# Altium PCB SOM_PCB_6Layer.PcbDoc (part 4 of 6)
Units mil, origin at the board's own origin, x right, y up, seen from the top; angles counter-clockwise.
Board outline 1230 x 2725 mil, 6 copper layers (Top Layer, GND+SHIELD, MidLayer1, MidLayer2, PWR, Bottom Layer), stack 60.8 mil thick; 76 components, 194 nets, 972 pads, 577 vias.
Unrouted connection lines stored in the file: 151.
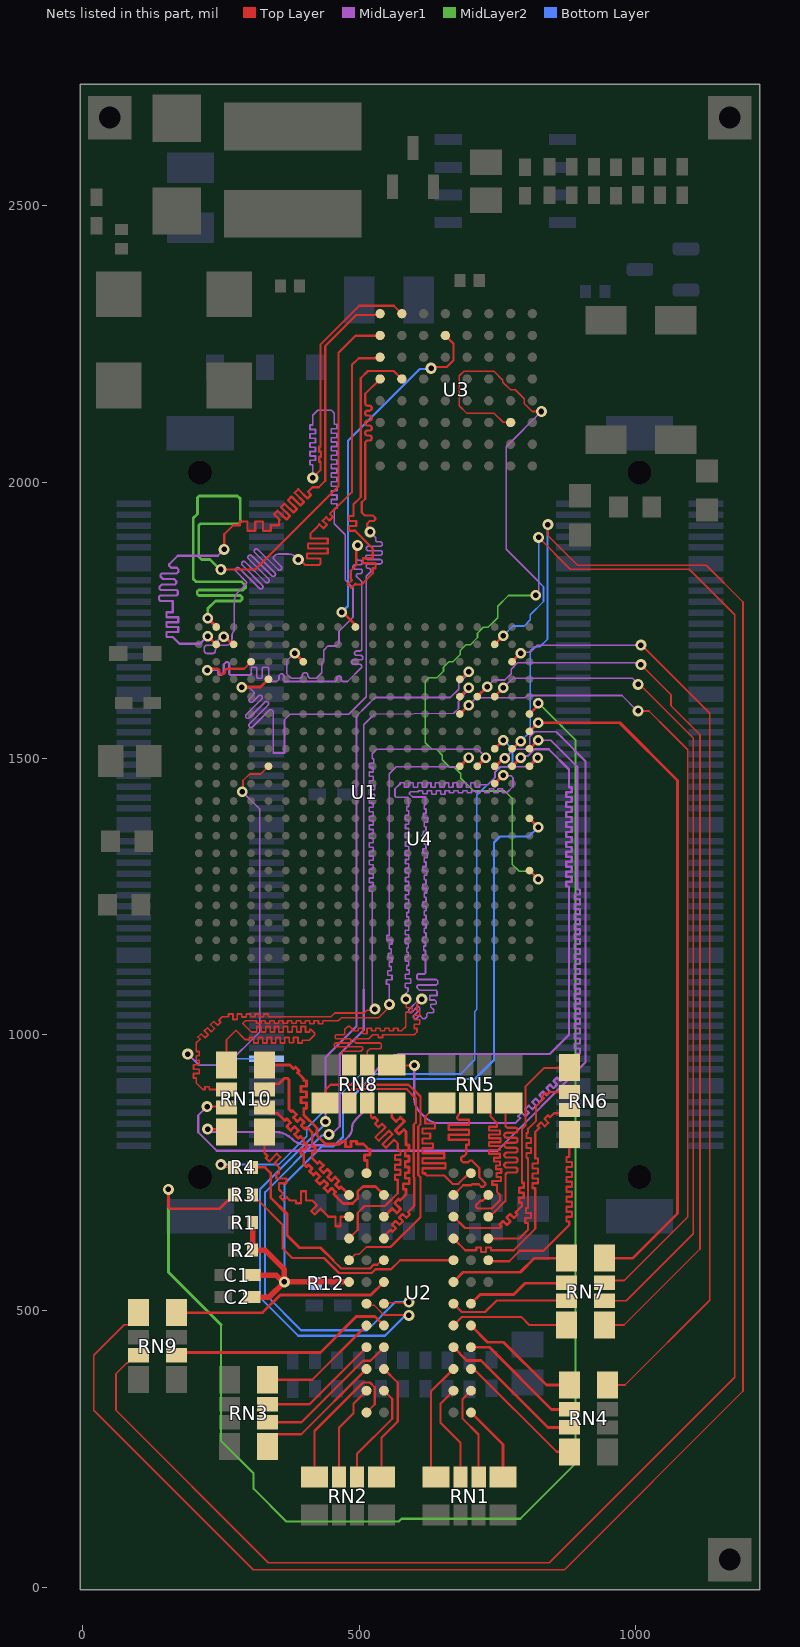
[diagram p7: the nets of this part, all layers, seen from the top]

## Via types
v1: diameter 19, hole 10, Top Layer to Bottom Layer, tented both sides, 352 vias
v2: diameter 20, hole 10, Top Layer to Bottom Layer, tented both sides, 223 vias
v3: diameter 20, hole 10, Top Layer to Bottom Layer, 1 vias
v4: diameter 30, hole 15, Top Layer to Bottom Layer, tented both sides, 1 vias

## Nets (pads, with @x,y where several pads share a name; then routed paths per layer and width w, separated by ;. In a path a pad name is that pad's centre, name@x,y a point inside that pad or via, vN(x,y) a via of type N, cw(c..) or ccw(c..) an arc to the next point about the centre after c; other vN are vias at no path point) (continued)
DDR_D9: RN8.3 U1.J20 | length 1581.9
  Top Layer w3: RN8.3@482.35,945 482.35,951 469.24,964.11 469.24,968.24 471,970 503.24,970 507,973.76 507,976.24 505.24,978 457,978 455,980 455,982.5 457.5,985 483.61,985 485.37,986.76 485.37,990.7 483.61,992.46 458.46,992.46 456.7,994.22 456.7,998.16 458.46,999.92 472.42,999.92 474.19,1001.69 474.19,1009.69 479.5,1015 483.29,1015 487.57,1010.72 487.57,1007 497,1007 498.5,1007 498.5,1009.24 498.5,1011.69 506.5,1011.69 506.5,1002 514.5,1002 514.5,1011.69 522.5,1011.69 522.5,1007 530.5,1007 530.5,1011.69 538.5,1011.69 538.5,1007 546.5,1007 546.5,1011.76 554.5,1011.76 554.5,1007 562.5,1007 562.5,1012 570.5,1012 570.5,1007 577,1007 ; 577.36,1007.36 577,1007 ; v2(585,1064.5) 585.5,1064 585.5,1056.5 585.5,1049 596.03,1049 596.03,1041 585.5,1041 584.59,1040.09 584.59,1014.59 577,1007
  Top Layer w5: U1.J20@808.46,1485.98 808.57,1485.98 823.59,1501 v1(823.7,1501)
  MidLayer1 w3: v2(585,1064.5) 585,1075 588.74,1078.74 588.74,1083.68 588.74,1085.18 583.74,1085.18 583.74,1093.18 593.74,1093.18 593.74,1101.18 583.74,1101.18 583.74,1109.18 590.76,1109.18 590.76,1117.18 586.24,1117.18 586.24,1125.18 589.74,1125.18 589.74,1133.18 583.74,1133.18 583.74,1141.18 589.22,1141.18 589.22,1149.18 586.24,1149.18 586.24,1157.18 589.22,1157.18 589.22,1165.18 583.74,1165.18 583.74,1173.18 589.74,1173.18 589.74,1181.18 583.75,1181.18 583.75,1189.18 589.74,1189.18 589.74,1197.18 583.74,1197.18 583.74,1205.18 589.74,1205.18 589.74,1213.18 586.24,1213.18 586.24,1221.18 589.74,1221.18 589.74,1229.18 583.74,1229.18 583.74,1237.18 589.74,1237.18 589.74,1245.18 584,1245.18 584,1253.18 589.74,1253.18 589.74,1261.18 583.74,1261.18 583.74,1269.18 589.74,1269.18 589.74,1277.18 584,1277.18 584,1285.18 589.74,1285.18 589.74,1293.18 583.74,1293.18 583.74,1301.18 589.74,1301.18 589.74,1309.18 584,1309.18 584,1317.18 589.74,1317.18 589.74,1325.18 583.74,1325.18 583.74,1333.18 589.74,1333.18 589.74,1341.18 584,1341.18 584,1349.18 589.74,1349.18 589.74,1357.18 583.74,1357.18 583.74,1365.18 589.74,1365.18 589.74,1373.18 584,1373.18 584,1381.18 589.74,1381.18 589.74,1389.18 583.74,1389.18 583.74,1397.18 589.74,1397.18 589.74,1405.18 586.24,1405.18 586.24,1413.18 589.88,1413.18 589.88,1421.18 588.74,1421.18 588.74,1425.59 588.74,1430 566.76,1430 565,1431.76 565,1445 572.61,1452.61 574.11,1452.61 574.11,1456.24 582.11,1456.24 582.11,1447.61 590.11,1447.61 590.11,1456.24 598.11,1456.24 598.11,1447.61 606.11,1447.61 606.11,1456.24 614.11,1456.24 614.11,1447.61 622.11,1447.61 622.11,1456.24 630.11,1456.24 630.11,1447.61 638.11,1447.61 638.11,1456.24 646.11,1456.24 646.11,1447.61 654.11,1447.61 654.11,1456.24 662.11,1456.24 662.11,1447.61 670.11,1447.61 670.11,1456.24 678.11,1456.24 678.11,1447.61 686.11,1447.61 686.11,1456 694.11,1456 694.11,1447.61 702.11,1447.61 702.11,1456 710.11,1456 710.11,1447.61 718.11,1447.61 718.11,1452.61 726.11,1452.61 733.54,1452.61 746.22,1465.28 746.22,1476.21 755,1484.99 805,1485 821.11,1501.11 821.21,1501 v1(823.7,1501)
DDR_D10: RN8.2 U1.K18 | length 1580.8
  Top Layer w3: RN8.2@515,945 515,970 519.7,974.7 538.24,974.7 540,976.45 540,983.24 538.24,985 494.13,985 492.37,986.76 492.37,990.74 494.13,992.5 517.5,992.5 525,1000 534.5,1000 534.5,995 542.5,995 542.5,1000 551.08,1000 600,1000 605,1005 605,1009.74 605,1011.24 600,1011.24 600,1019.24 610,1019.24 610,1027.24 600,1027.24 600,1035.24 610,1035.24 610,1043.24 605,1043.24 605,1045 605,1054.98 613.5,1063.48 v2(613.5,1064.5)
  Top Layer w5: U1.K18@745.47,1454.49 745.59,1454.49 761.1,1470 v1(761.22,1470)
  MidLayer1 w3: v2(613.5,1064.5) 609.5,1064.5 590,1045 590,1041.76 591.76,1040 595,1040 606.38,1051.38 607.12,1051.38 610,1048.5 610,1045 598.13,1033.13 598.13,1031.87 601.26,1028.74 603.74,1028.74 610,1035 615.01,1029.99 616.26,1028.74 618.74,1028.74 622.5,1032.5 622.5,1037.5 625,1040 633.24,1040 635,1041.76 635,1045 630,1050 630,1055 638.24,1055 640,1056.76 640,1060 637.06,1062.94 628,1062.94 628,1070.94 641.23,1070.94 641.23,1078.94 639.73,1080.44 609.56,1080.44 605,1085 605,1088.24 606.76,1090 640,1090 642.23,1092.23 642.23,1097.77 640,1100 606.76,1100 605,1101.76 605,1108.24 606.76,1110 618.47,1110 620.23,1111.76 620.23,1135 620.23,1136.5 615.23,1136.5 615.23,1144.5 620.23,1144.5 620.23,1152.5 617.22,1152.5 617.22,1160.5 620.23,1160.5 620.23,1168.5 615.23,1168.5 615.23,1176.5 621.24,1176.5 621.24,1184.5 617.74,1184.5 617.74,1192.5 621.24,1192.5 621.24,1200.5 615.23,1200.5 615.23,1208.5 621.24,1208.5 621.24,1216.5 617.74,1216.5 617.74,1224.5 621.67,1224.5 621.67,1232.5 615.23,1232.5 615.23,1240.5 621.24,1240.5 621.24,1248.5 617.74,1248.5 617.74,1256.5 622.17,1256.5 622.17,1264.5 615.23,1264.5 615.23,1272.5 621.24,1272.5 621.24,1280.5 617.74,1280.5 617.74,1288.5 622.68,1288.5 622.68,1296.5 615.23,1296.5 615.23,1304.5 621.24,1304.5 621.24,1312.5 617.74,1312.5 617.74,1320.5 623.18,1320.5 623.18,1328.5 615.79,1328.5 615.79,1336.5 621.24,1336.5 621.24,1344.5 617.74,1344.5 617.74,1352.5 623.69,1352.5 623.69,1360.5 616.29,1360.5 616.29,1368.5 621.24,1368.5 621.24,1376.5 617.74,1376.5 617.74,1384.5 624.19,1384.5 624.19,1392.5 616.8,1392.5 616.8,1400.5 621.24,1400.5 621.24,1408.5 617.74,1408.5 617.74,1416.5 620.23,1416.5 620.23,1420.5 620.23,1430.23 597,1430.23 591.47,1435.76 591.47,1438.24 593.23,1440 606.11,1440 607.61,1440 607.61,1441.61 615.61,1441.61 615.61,1436.23 623.61,1436.23 623.61,1441.61 631.61,1441.61 631.61,1435 639.61,1435 639.61,1441.61 647.61,1441.61 647.61,1435 655.61,1435 655.61,1441.61 663.61,1441.61 663.61,1438 671.61,1438 671.61,1441.61 679.61,1441.61 679.61,1438 687.61,1438 687.61,1441.61 695.61,1441.61 695.61,1438 703.61,1438 703.61,1441.61 711.61,1441.61 711.61,1438 719.61,1438 719.61,1441.8 727.61,1441.8 727.61,1438 735.61,1438 735.61,1445 743.61,1445 743.61,1438 751.61,1438 751.61,1445 759.61,1445 759.61,1438 767.61,1438 778.72,1449.11 778.72,1465 775.22,1468.5 762.72,1468.5 v1(761.22,1470)
DDR_D11: RN8.1 U1.H20 | length 1581.3
  Top Layer w4: RN8.1@559.15,945 559.65,944.5 v2(600,944.5)
  Top Layer w5: U1.H20@808.46,1517.48 v1(824.21,1533.23)
  MidLayer1 w3: v1(824.21,1533.23) 846.77,1533.23 866.75,1513.25
  MidLayer1 w4: v2(600,944.5) 600,884.14 ccw(c634.14,884.14) 609.98,860.02 620,850 ccw(c644.14,874.14) 644.14,840 782.73,840 787.24,844.52 791.76,849.03 788.23,852.57 794.59,858.93 801.11,852.42 807.47,858.78 800.95,865.3 807.32,871.66 813.83,865.15 820.2,871.51 813.68,878.03 820.05,884.39 826.56,877.87 832.93,884.24 826.41,890.75 832.77,897.12 839.29,890.6 845.65,896.97 839.14,903.48 845.5,909.85 852.02,903.33 858.38,909.69 851.87,916.21 858.23,922.57 864.74,916.06 871.11,922.42 864.59,928.94 870.96,935.3 877.47,928.79 883.84,935.15 877.32,941.67 883.69,948.03 887.22,944.49 895,952.27 895,955.1 895,966 900,966 900,975 890,975 890,984 900,984 900,993 890,993 890,1002 900,1002 900,1011 890,1011 890,1020 900,1020 900,1029 890,1029 890,1038 900,1038 900,1047 890,1047 890,1056 900,1056 900,1065 890,1065 890,1074 900,1074 900,1083 890,1083 890,1092 900,1092 900,1101 890,1101 890,1110 900,1110 900,1119 890,1119 890,1128 900,1128 900,1137 890,1137 890,1146 900,1146 900,1155 890,1155 890,1164 900,1164 900,1173 890,1173 890,1182 900,1182 900,1191 890,1191 890,1200 900,1200 900,1209 890,1209 890,1218 900,1218 900,1227 890,1227 890,1236 900,1236 900,1245 890,1245 890,1254 900,1254 900,1263 895,1263 895,1265 895,1485 866.75,1513.25
DDR_D12: RN10.4 U1.J19 | length 1625.5
  Top Layer w4: v2(226,829) 255,829 RN10.4@260,824
  Top Layer w5: U1.J19@776.97,1485.98 777.33,1485.98 792.35,1501 v1(792.72,1501)
  MidLayer1 w4: v2(226,829) 231,824 348.99,824 cw(c348.99,783.03) 377.96,812 ccw(c406.93,840.97) 406.93,800 453.47,800 ccw(c453.47,827.84) 473.15,808.15 481.31,816.31 ccw(c466.74,830.87) 487.34,830.87 cw(c507.94,830.87) 493.36,845.43 513.97,866.03 ccw(c492.75,887.25) 522.75,887.25 522.75,910.43 cw(c564.57,910.43) 534.98,939.98 547.5,952.5 cw(c577.68,922.32) 577.68,965 845,965 880,1000 880,1266 880,1268 875,1268 875,1277 885,1277 885,1286 875,1286 875,1295 885,1295 885,1304 875,1304 875,1313 885,1313 885,1322 875,1322 875,1331 885,1331 885,1340 875,1340 875,1349 885,1349 885,1358 875,1358 875,1367 885,1367 885,1376 875,1376 875,1385 885,1385 885,1394 875,1394 875,1403 885,1403 885,1412 875,1412 875,1421 885,1421 885,1430 875,1430 875,1439 884.85,1439 884.85,1448 880,1448 880,1460 880,1480 843.27,1516.73 818,1516.73 805.5,1504.24 795.4,1504.24 792.72,1501.56 v1(792.72,1501)
DDR_D13: RN10.3 U1.J18 | length 1636.4
  Top Layer w4: v2(225,870) 258.2,870 RN10.3@260,868.2
  Top Layer w5: U1.J18@745.47,1485.98 747.44,1485.98 761.75,1500.3 v1(763.72,1500.3)
  MidLayer1 w3: v1(763.72,1500.3) 779.99,1516.56 801.56,1516.56 809.21,1524.21 809.21,1539.44 818,1548.23 856.77,1548.23 866.75,1538.25
  MidLayer1 w4: v2(225,870) 209,854 209,823.37 242.37,790 750,790 910,950 910,1495 866.75,1538.25
DDR_D14: RN10.2 U1.J17 | length 1597.3
  Top Layer w3: RN10.2@260,900.85 238.61,900.85 229.11,900.85 229.11,905.85 221.11,905.85 221.11,900.85 217.23,900.85 205.5,912.58 205.5,920.19 205.5,921.69 200.5,921.69 200.5,929.69 210.5,929.69 210.5,937.69 200.5,937.69 200.5,945.69 210.5,945.69 210.5,953.69 205.5,953.69 205.5,961.69 210.5,961.69 210.5,969.69 205.5,969.69 205.5,975 205.5,985.5 211.12,991.12 212.18,992.18 208.65,995.72 214.3,1001.37 221.37,994.3 227.03,999.96 219.96,1007.03 225.62,1012.69 232.69,1005.62 238.34,1011.27 231.27,1018.34 236.93,1024 244,1016.93 249.66,1022.59 246.12,1026.12 252.5,1032.5 262.28,1032.5 263.78,1032.5 263.78,1037.5 271.78,1037.5 271.78,1027.5 279.78,1027.5 279.78,1037.5 287.78,1037.5 287.78,1032 295.78,1032 295.78,1037.5 303.78,1037.5 303.78,1032.5 311.78,1032.5 311.78,1037.5 319.78,1037.5 319.78,1032.5 327.78,1032.5 327.78,1037.5 335.78,1037.5 335.78,1032.5 350.91,1032.5 449.32,1032.5 456.16,1039.34 509.34,1039.34 514.31,1044.31 526.94,1044.31 v2(528.81,1046.19)
  Top Layer w5: U1.J17@713.98,1485.98 v1(729.72,1501.73)
  MidLayer1 w3: v2(528.81,1046.19) 528.81,1050.79 523.63,1055.97 523.63,1258 523.63,1259.5 518.63,1259.5 518.63,1267.5 526,1267.5 526,1275.5 518.63,1275.5 518.63,1283.5 526,1283.5 526,1291.5 518.63,1291.5 518.63,1299.5 526,1299.5 526,1307.5 518.63,1307.5 518.63,1315.5 526,1315.5 526,1323.5 518.63,1323.5 518.63,1331.5 526,1331.5 526,1339.5 518.63,1339.5 518.63,1347.5 526,1347.5 526,1355.5 518.63,1355.5 518.63,1363.5 526,1363.5 526,1371.5 518.63,1371.5 518.63,1379.5 526,1379.5 526,1387.5 518.63,1387.5 518.63,1395.5 526,1395.5 526,1403.5 518.63,1403.5 518.63,1411.5 526,1411.5 526,1419.5 518.63,1419.5 518.63,1427.5 528.63,1427.5 528.63,1435.5 518.63,1435.5 518.63,1443.5 528.63,1443.5 528.63,1451.5 518.63,1451.5 518.63,1459.5 526,1459.5 526,1467.5 518.63,1467.5 518.63,1475.5 526,1475.5 526,1483.5 518.63,1483.5 518.63,1491.5 526.75,1491.5 526.75,1499.5 523.63,1499.5 523.63,1508.63 531.73,1516.73 714.72,1516.73 v1(729.72,1501.73)
DDR_D15: RN10.1 U1.J16 | length 1637.8
  Top Layer w3: RN10.1@260,945 260,990.62 277.19,1007.81 291.46,993.54 291.46,993.22 293.22,991.46 298.54,991.46 300,990 301.5,990 301.5,995 309.5,995 309.5,985 317.5,985 317.5,995 325.5,995 325.5,985 333.5,985 333.5,995 341.5,995 341.5,985 349.5,985 349.5,995 357.5,995 357.5,985 365.5,985 365.5,995 373.5,995 373.5,985.5 381.5,985.5 381.5,995 389.5,995 389.5,985 397.5,985 397.5,990 405.88,990 410,990 420,1000 420,1002.49 412.49,1010 410.98,1010 410.98,1005 402.98,1005 402.98,1015 394.98,1015 394.98,1005 386.98,1005 386.98,1015 378.98,1015 378.98,1005 370.98,1005 370.98,1015 362.98,1015 362.98,1005 354.98,1005 354.98,1015 346.98,1015 346.98,1005 338.98,1005 338.98,1015 330.98,1015 330.98,1005 322.98,1005 322.98,1015 314.98,1015 314.98,1005 306.98,1005 305,1005 289.69,1020.31 294.38,1025 305,1025 306.5,1025 306.5,1025.5 314.5,1025.5 314.5,1021 322.5,1021 322.5,1025.5 330.5,1025.5 330.5,1021 338.5,1021 338.5,1025.5 346.5,1025.5 346.5,1021 354.5,1021 354.5,1025.5 362.5,1025.5 362.5,1021 370.5,1021 370.5,1025.5 378.5,1025.5 378.5,1021 386.5,1021 386.5,1025.5 394.5,1025.5 394.5,1021 402.5,1021 402.5,1025.5 410.5,1025.5 410.5,1020 418.5,1020 418.5,1025.5 426.5,1025.5 426.5,1020 434.5,1020 434.5,1025.5 442.5,1025.5 442.5,1025 445.66,1025 462.63,1025 468.32,1030.69 535.23,1030.69 555,1050.45 v2(555,1055)
  Top Layer w5: U1.J16@682.48,1485.98 v1(698.23,1501.73)
  MidLayer1 w3: v2(555,1055) 554.75,1055.25 554.75,1090 554.75,1091.5 549.75,1091.5 549.75,1099.5 559.75,1099.5 559.75,1107.5 552.27,1107.5 552.27,1115.5 558.24,1115.5 558.24,1123.5 554.75,1123.5 554.75,1131.5 559.75,1131.5 559.75,1139.5 552.77,1139.5 552.77,1147.5 558.24,1147.5 558.24,1155.5 554.75,1155.5 554.75,1163.5 559.75,1163.5 559.75,1171.5 550.04,1171.5 550.04,1179.5 554.75,1179.5 554.75,1205 554.75,1472.54 567.21,1485 681.5,1485 v1(698.23,1501.73)
DDR_D\C\A\S\: RN7.3 U1.F16 | length 1512.6
  Top Layer w3: RN7.3@944.5,551.3 948.2,555 980,555 1095,670 1095,1515.92 1061.42,1549.5 1024.92,1586 v2(1005,1586)
  Top Layer w5: U1.F16@682.48,1580.47 v1(698.23,1596.22)
  MidLayer1 w3: v1(698.23,1596.22) 712.01,1610 800.51,1610 804.51,1614 975.83,1614 1003.83,1586 v2(1005,1586)
DDR_D\C\L\K\E\: RN9.3 U1.B18 | length 3533
  Top Layer w3: RN9.3@101,420.05 95,420.05 80.8,405.85 79.72,405.85 60,386.13 60,320 335.5,44.5 844.5,44.5 1180,380 1180,1760 1097.5,1842.5 882.5,1842.5 v2(825,1900)
  Top Layer w5: U1.B18@745.47,1706.46 v1(761.22,1722.2)
  Bottom Layer w3: v1(761.22,1722.2) 778.72,1739.7 798.8,1739.7 810,1750.9 810,1760 834,1784 834,1810.8 825.5,1819.3 825.5,1899.5 v2(825,1900)
DDR_D\C\S\0\: RN4.4 U1.C19 | length 1737.4
  Top Layer w3: RN4.4@950,366 981.47,366 1135,519.53 1135,1581.92 1011.92,1705 v2(1010,1705)
  Top Layer w5: U1.C19@776.97,1674.96 v1(792.72,1690.71)
  MidLayer1 w3: v1(792.72,1690.71) 794.43,1692.42 809.72,1692.42 822.3,1705 v2(1010,1705) v2@1015,1705
DDR_D\R\A\S\: RN7.1 U1.E17 | length 1659.2
  Top Layer w3: RN7.1@944.5,474.5 979.5,474.5 1117,612 1117,1543 1064.5,1595.5 1064.5,1615.5 v2(1010,1670)
  Top Layer w5: U1.E17@713.98,1611.97 v1(731.68,1629.68)
  MidLayer1 w3: v1(731.68,1629.68) 744.1,1642.1 763.9,1642.1 775.22,1653.41 775.22,1661.48 786.94,1673.2 1006.8,1673.2 v2(1010,1670)
DDR_D\W\R\: RN7.2 U1.E18 | length 1526.2
  Top Layer w3: RN7.2@944.5,518.65 983.65,518.65 1105,640 1105,1536.92 1060.09,1581.83 1007.92,1634 v2(1005,1634)
  Top Layer w5: U1.E18@745.47,1611.97 v1(761.22,1627.72)
  MidLayer1 w3: v1(761.22,1627.72) 778.5,1645 995,1645 1005,1635 v2(1005,1634)
DDR_DCLK0_N: U1.E16 U2.G3 | length 1715.8
  Top Layer w3: U2.G3@545,513.15 546.49,514.64 v2@587.75,514.64
  Top Layer w4: U1.E16@682.48,1611.97 v1(698.23,1627.72)
  MidLayer1 w3: 508.5,1081.24 508.5,1560.76 527.68,1579.94 671.54,1581.96 680,1590.42 680,1603.48 689.23,1612.71 689.23,1615.85 698.23,1624.84 v1(698.23,1627.72)
  MidLayer1 w4: v2(445.51,819.49) 448.57,822.56 453.45,822.56 465,834.1 465,964.9 508.5,1008.4 508.5,1081.24
  Bottom Layer w4: v2(445.51,819.49) 443.78,817.76 432.76,817.76 330,715 330,530 395,465 514.6,465 565.73,516.13 v2(590.26,516.13)
DDR_DCLK0_P: U1.D16 U2.G2 | length 1789.9
  Top Layer w3: U2.G2@513.5,513.15 516.01,510.64 527,510.64 544.99,492.65 588.73,492.65 589.24,492.13 v2(590.26,492.13)
  Top Layer w4: U1.D16@682.48,1643.46 683.73,1643.46 696.98,1656.71 v1(698.23,1656.71)
  MidLayer1 w3: 495.5,1081.24 495.5,1576.97 513.07,1594.55 528.75,1610.22 665.22,1610.22 680.19,1625.19 680.19,1635.5 698.23,1653.53 v1(698.23,1656.71)
  MidLayer1 w4: v2(439.31,842.68) 439.31,959.31 495.5,1015.5 495.5,1081.24
  Bottom Layer w4: v2(439.31,842.68) 439.31,839.06 321,720.75 321,524.1 390.1,455 547,455 585.54,493.54 588.86,493.54 v2(590.26,492.13)
DDR_DQM0: RN7.4 U1.G20 | length 1267.1
  Top Layer w5: U1.G20@808.46,1548.98 v1(824.21,1564.72) 971.94,1564.72 1076.5,1460.17 1076.5,676.5 995.5,595.5 RN7.4@944.5,595.5
DDR_DQM1: RN9.1 U1.H19 | length 3935.1
  Top Layer w3: RN9.1@101,496.85 101,491.35 84.5,474.85 74.85,474.85 20,420 20,320 308.28,31.72 871.72,31.72 1195,355 1195,1783.08 1128.58,1849.5 895.5,1849.5 841.97,1903.03 v2(841.97,1923.23)
  Top Layer w5: U1.H19@776.97,1517.48 777.99,1517.48 792.07,1531.56 v1(793.09,1531.56)
  Bottom Layer w3: v1(793.09,1531.56) 810,1548.47 810,1695 817.2,1702.2 827.2,1702.2 841,1716 841,1922.26 v2(841.97,1923.23)
DDR_DQS0: R3.1 U1.F20 | length 2848
  Top Layer w5: v2(155,720) 155,687.93 157.93,685 247.48,685 R3.1@272.48,710 ; U1.F20@808.46,1580.47 824.21,1596.22 v1(824.21,1600)
  MidLayer2 w3: v1(824.21,1600) 825.04,1600 866.75,1558.29
  MidLayer2 w4: 250,475 250,265 309.19,205.81 309.19,178.19 368.37,119 571.84,119 576.84,124 791.63,124 892,224.37 892,1533.04 866.75,1558.29
  MidLayer2 w5: v2(155,720) 155,570 250,475
DDR_DQS1: R4.1 U1.H18 | length 1212.6
  Top Layer w3: v2@250,760 R4.1@272.48,760
  Top Layer w5: U1.H18@745.47,1517.48 v1(761.22,1533.23)
  Bottom Layer w3: v2(250,765) 354.64,765 405.6,815.96 405.6,830.89 503.71,929 684,929 709.5,954.5 709.5,1041.92 713.22,1045.64 713.22,1433.7 746.05,1466.52 746.05,1474.62 756.57,1485.15 768.38,1485.15 777.72,1494.5 777.72,1516.72 761.77,1532.68 761.77,1533.23 v1(761.22,1533.23)
DDR_RES_A0: RN1.8 U2.K7 | length 216.5
  Top Layer w4: RN1.8@639.5,199.5 630,209 630,354.06 U2.K7@670.98,395.04
DDR_RES_A1: RN1.6 U2.L8 | length 174.3
  Top Layer w4: U2.L8@702.48,355.67 687.48,340.67 687.48,305.15 716.35,276.28 RN1.6@716.35,199.5
DDR_RES_A2: RN1.7 U2.L7 | length 180.9
  Top Layer w4: U2.L7@670.98,355.67 647.5,332.18 647.5,297.5 683.7,261.3 RN1.7@683.7,199.5
DDR_RES_A3: RN1.5 U2.M8 | length 144.3
  Top Layer w5: U2.M8@699.99,313.81 U2.M8@702.48,316.3 760.5,258.28 RN1.5@760.5,199.5
DDR_RES_A4: RN2.8 U2.M2 | length 284.2
  Top Layer w4: RN2.8@419.5,199.5 419.5,282.88 507.29,370.67 519.72,370.67 528.5,361.88 528.5,331.3 U2.M2@513.5,316.3
DDR_RES_A5: RN2.6 U2.L3 | length 188.7
  Top Layer w4: RN2.6@496.35,199.5 496.35,241.35 560,305 560,340.67 U2.L3@545,355.67
DDR_RES_A6: RN2.7 U2.L2 | length 176.8
  Top Layer w4: RN2.7@463.7,199.5 463.7,288.7 490,315 490,332.17 U2.L2@513.5,355.67
DDR_RES_A7: RN2.5 U2.K3 | length 218.1
  Top Layer w4: RN2.5@540.5,199.5 540.5,270.5 570,300 570,370.04 U2.K3@545,395.04
DDR_RES_A8: RN3.5 U2.K2 | length 240.4
  Top Layer w4: RN3.5@334.5,254.5 334.5,260 351.5,277 395.46,277 U2.K2@513.5,395.04
DDR_RES_A9: RN3.6 U2.J3 | length 266.7
  Top Layer w4: RN3.6@334.5,298.65 395.9,298.65 507.29,410.04 520.63,410.04 U2.J3@545,434.41
DDR_RES_A10: RN4.8 U2.K8 | length 240.7
  Top Layer w4: U2.K8@702.48,395.04 707.59,395.04 857.63,245 RN4.8@881,245
DDR_RES_A11: RN3.7 U2.J2 | length 221.7
  Top Layer w4: RN3.7@334.5,331.3 410.39,331.3 U2.J2@513.5,434.41
DDR_RES_A12: RN3.8 U2.H2 | length 219.7
  Top Layer w4: RN3.8@334.5,375.5 415.22,375.5 U2.H2@513.5,473.78
DDR_RES_BA0: RN4.6 U2.J8 | length 225.1
  Top Layer w5: U2.J8@702.48,434.41 735.59,434.41 848.15,321.85 RN4.6@881,321.85
DDR_RES_BA1: RN4.7 U2.J7 | length 270.2
  Top Layer w5: U2.J7@670.98,434.41 694.85,410.54 720.77,410.54 842.11,289.2 RN4.7@881,289.2
DDR_RES_D0: RN5.5 U2.A8 | length 514.8
  Top Layer w4: RN5.5@650,876 644.5,876 620,851.5 620,849.19 620,839.34 637.72,839.34 637.72,830.34 615,830.34 615,821.34 629,821.34 629,812.34 615,812.34 615,803.34 634.03,803.34 634.03,794.34 615,794.34 615,785.34 654.1,785.34 654.1,776.34 615,776.34 615,767.34 656.58,767.34 656.58,758.34 615,758.34 615,749.34 620,749.34 620,747.34 622.34,745 654.14,745 669.14,730 679.67,730 699.04,749.37 U2.A8@702.48,749.37
DDR_RES_D1: RN5.7 U2.B9 | length 503.7
  Top Layer w4: RN5.7@726.8,876 737.8,865 737.8,852.2 749.49,840.51 749.49,838.83 749.49,833.47 735.25,833.47 735.25,826.47 754.99,826.47 754.99,819.47 735.25,819.47 735.25,812.47 755.81,812.47 755.81,805.47 735.25,805.47 735.25,798.47 754.99,798.47 754.99,791.47 735.25,791.47 735.25,784.47 754.99,784.47 754.99,777.47 744.01,777.47 744.01,770.47 754.99,770.47 754.99,763.47 748.09,763.47 748.09,756.47 757.29,756.47 757.29,749.47 748.98,749.47 748.98,742.47 757.14,742.47 757.14,735.47 741.29,735.47 741.29,728.47 749.49,728.47 749.49,726.47 749.49,715.51 755,710 755,700.38 740.25,685.63 714.37,685.63 711.66,688.34 711.66,691.66 719.49,699.49 723.27,699.49 733.79,710 U2.B9@733.98,710
DDR_RES_D2: RN5.6 U2.B7 | length 423.8
  Top Layer w4: U2.B7@670.98,710 688.7,727.72 702.75,727.72 704.48,729.45 716.57,729.45 721.03,725 725,725 728.34,728.34 728.34,731.66 717.48,742.52 717.48,758.91 704.06,772.33 700.74,772.33 697.64,769.23 688.12,769.23 685,772.34 685,777.66 687.34,780 690,780 694.15,784.15 694.15,801 699.15,801 699.15,810 662.3,810 662.3,819 699.15,819 699.15,828 662.3,828 662.3,837 699.15,837 699.15,846 679.99,846 677.64,848.35 677.64,851.66 680.5,854.51 680.5,856.35 687.21,863.06 RN5.6@694.15,863.06
DDR_RES_D3: RN5.8 U2.C9 | length 419.4
  Top Layer w4: U2.C9@733.98,670.63 736.56,670.63 745.47,679.53 763.96,698.03 765.14,699.21 765.14,735.08 765.14,746.08 cw(c769.64,746.08) 769.64,750.58 782.5,750.58 ccw(c782.5,755.08) 782.5,759.58 767.49,759.58 cw(c767.49,764.08) 767.49,768.58 782.5,768.58 ccw(c782.5,773.08) 782.5,777.58 767.49,777.58 cw(c767.49,782.08) 767.49,786.58 782.5,786.58 ccw(c782.5,791.08) 782.5,795.58 767.49,795.58 cw(c767.49,800.08) 767.49,804.58 782.5,804.58 ccw(c782.5,809.08) 782.5,813.58 767.49,813.58 cw(c767.49,818.08) 767.49,822.58 782.5,822.58 ccw(c782.5,827.08) 782.5,831.58 769.64,831.58 cw(c769.64,836.08) 765.14,836.08 765.14,854.92 765.14,870.14 RN5.8@771,876
DDR_RES_D4: RN6.5 U2.C7 | length 534.1
  Top Layer w4: U2.C7@670.98,670.63 691.61,650 755,650 756.45,651.45 757.86,652.86 754.33,656.4 760.69,662.76 767.76,655.69 774.13,662.05 767.05,669.13 773.42,675.49 780.49,668.42 786.85,674.78 783.32,678.32 790,685 795,690 795,694 795,696 790,696 790,705 798,705 798,714 790,714 790,723 798,723 798,732 795,732 795,741 795,830 801.5,836.5 801.5,906.5 835,940 878.25,940 RN6.5@880.5,937.75
DDR_RES_D5: RN6.6 U2.D9 | length 454.5
  Top Layer w4: U2.D9@733.98,631.26 789.95,631.26 806,647.31 806,657.24 806,659.24 801,659.24 801,668.24 811,668.24 811,677.24 802.06,677.24 802.06,686.24 806,686.24 806,695 806,775 806,777 803,777 803,786 811,786 811,795 803,795 803,804 811,804 811,813 803,813 803,822 806,822 806,829.69 820.5,844.19 820.5,870.5 833.43,883.43 834.84,884.84 831.3,888.38 837.67,894.74 841.2,891.2 845.8,895.8 846.35,896.35 RN6.6@880.5,896.35
DDR_RES_D6: RN6.7 U2.D7 | length 542.1
  Top Layer w4: U2.D7@670.98,631.26 692.24,610 710,610 712,610 712,615 721,615 721,606.89 730,606.89 730,615 739,615 739,610 745,610 780,610 819,649 819,720 819,722 814,722 814,731 824,731 824,740 814,740 814,749 824,749 824,758 814,758 814,767 824,767 824,776 819,776 819,785 819,824 825,830 826.41,831.41 822.88,834.95 829.24,841.31 836.31,834.24 842.68,840.61 835.61,847.68 841.97,854.04 845.51,850.51 853,858 874.8,858 RN6.7@880.5,863.7
DDR_RES_D7: RN6.8 U2.E9 | length 468.4
  Top Layer w4: U2.E9@733.98,591.89 735.87,590 772.02,590 791.01,608.99 833.99,608.99 880.5,655.5 880.5,659.7 880.5,661.7 875.5,661.7 875.5,670.7 885.5,670.7 885.5,679.7 875.5,679.7 875.5,688.7 885.5,688.7 885.5,697.7 875.5,697.7 875.5,706.7 885.5,706.7 885.5,715.7 875.5,715.7 875.5,724.7 885.5,724.7 885.5,733.7 875.5,733.7 875.5,742.7 885.5,742.7 885.5,751.7 875.5,751.7 875.5,760.7 885.5,760.7 885.5,769.7 875.5,769.7 875.5,778.7 880.5,778.7 880.5,785 RN6.8@880.5,819.5
DDR_RES_D8: RN8.5 U2.E1 | length 592.4
  Top Layer w3: U2.E1@482.01,591.89 492.88,602.76 499.85,602.76 512.85,615.76 557.08,615.76
  Top Layer w4: RN8.5@438.15,876 440,877.85 440,901 448.5,909.5 589.66,909.5 611.15,888.01 611.15,837.81 607,833.66 607,746.03 611.15,741.88 611.15,669.83 557.08,615.76
DDR_RES_D9: RN8.6 U2.D3 | length 483.7
  Top Layer w4: RN8.6@482.3,876 483.3,877 483.3,899.57 485.23,901.5 586.34,901.5 603.15,884.69 603.15,841.12 599,836.97 599,742.72 600,741.72 600,689.85 590.07,679.92 588.66,678.51 592.2,674.98 585.83,668.61 578.76,675.68 572.4,669.32 579.47,662.25 573.1,655.88 566.03,662.95 559.67,656.59 566.74,649.52 560.38,643.16 556.84,646.69 549.44,639.29 545,634.85 U2.D3@545,631.26 U2.D3@548.76,631.26
DDR_RES_D10: RN8.7 U2.D1 | length 503.4
  Top Layer w4: U2.D1@482.01,631.26 497.51,646.76 497.51,677.51 510,690 546.92,690 ; RN8.7@514.95,876 521.83,869.12 521.83,851.5 523.8,849.53 525.22,848.12 528.1,851 534.46,844.64 528.73,838.9 535.09,832.54 541.48,838.93 547.84,832.56 529.57,814.29 535.93,807.92 554.21,826.2 560.57,819.83 542.3,801.56 548.66,795.19 563.4,809.93 570,803.33 570,793.5 570,791.5 575,791.5 575,782.5 565,782.5 565,773.5 575,773.5 575,764.5 565,764.5 565,755.5 575,755.5 575,746.5 565,746.5 565,737.5 570,737.5 570,730 570,720 570,713.08 548.69,691.77 547.98,691.77
DDR_RES_D11: RN8.8 U2.C3 | length 374.4
  Top Layer w5: U2.C3@545,670.63 551.25,676.88 560.09,685.72 568.43,677.37 575.5,684.44 564.44,695.5 571.51,702.57 574.23,699.86 579.68,705.31 585,710.63 585,717.86 585,720.36 580,720.36 580,730.36 590.83,730.36 590.83,740.36 583.5,740.36 583.5,750.36 590.5,750.36 590.5,760.36 583.5,760.36 583.5,770.36 590.5,770.36 590.5,780.36 583.5,780.36 583.5,790.36 590.5,790.36 590.5,800.36 585,800.36 585,810 585,825 583.16,826.84 581.4,828.6 572.61,819.82 565.54,826.89 582.08,843.43 575.01,850.5 567.25,842.75 560.92,849.08 559.15,850.85 RN8.8@559.15,876
DDR_RES_D12: RN10.5 U2.C1 | length 462.8
  Top Layer w4: RN10.5@329,824 329,786 334.49,780.51 330.96,776.97 337.32,770.61 351.22,784.51 357.59,778.14 347.22,767.78 355,760 355,749 350,749 350,740 368.49,740 368.49,731 355,731 355,720 362.78,712.22 356.73,706.17 363.09,699.81 369.14,705.86 375,700 377.31,700 379.62,700 386,700 386,695 395,695 395,716.66 404,716.66 404,700 415,700 415.97,699.03 423.75,691.25 413.46,680.96 419.83,674.6 430.11,684.89 435,680 443.28,671.72 444.37,670.63 446.55,670.63 457.55,670.63 457.55,653.24 466.55,653.24 466.55,670.63 U2.C1@482.01,670.63
DDR_RES_D13: RN10.6 U2.B3 | length 463.7
  Top Layer w5: RN10.6@329,868.15 339.5,857.65 352.35,857.65 363.83,846.17 365.6,844.4 369.14,847.93 376.21,840.86 369.14,833.79 376.21,826.72 383.28,833.79 390.35,826.72 383.28,819.65 390.35,812.58 393.89,816.11 398.23,811.77 400,810 400,805.98 400,803.48 405,803.48 405,793.48 395,793.48 395,783.48 400,783.48 400,775 400,765.73 402.86,762.86 404.63,761.1 408.17,764.63 415.24,757.56 410.51,752.83 417.58,745.76 422.31,750.49 429.38,743.42 422.31,736.35 429.38,729.28 436.45,736.35 443.52,729.28 436.45,722.21 443.52,715.13 450.59,722.21 457.66,715.13 454.13,711.6 458.6,707.13 460.36,705.36 471.23,694.5 488.43,694.5 497.51,703.58 497.51,715.92 507.08,725.5 529.5,725.5 U2.B3@545,710
DDR_RES_D14: RN10.7 U2.B1 | length 405.9
  Top Layer w5: RN10.7@329,900.8 339.5,911.3 355.44,911.3 365.36,921.22 370.36,921.22 373.29,918.29 373.29,886.71 373.29,865.06 375.82,862.52 377.59,860.76 379.55,862.72 386.62,855.65 381.12,850.15 388.19,843.08 393.69,848.58 400.76,841.51 395.26,836.01 402.34,828.94 405.87,832.47 407.4,830.94 409.17,829.17 415.11,823.24 415.11,799.74 415.11,797.24 420.11,797.24 420.11,787.24 415.11,787.24 415.11,776.9 423.15,768.86 424.92,767.09 428.46,770.62 435.53,763.55 428.75,756.78 435.82,749.71 442.6,756.48 449.67,749.41 442.89,742.63 449.96,735.56 456.74,742.34 463.81,735.27 457.03,728.49 464.11,721.42 467.35,724.66 471.74,720.27 473.5,718.5 U2.B1@482.01,710
DDR_RES_D15: RN10.8 U2.A2 | length 449.2
  Top Layer w5: RN10.8@329,945 375,945 379.87,940.13 381.63,938.37 384.79,941.52 391.86,934.45 388.7,931.3 398.23,921.77 400,920 400,919.14 400,916.64 405,916.64 405,906.64 395,906.64 395,896.64 405,896.64 405,886.64 395,886.64 395,876.64 405,876.64 405,866.64 400,866.64 400,855 424.11,830.89 424.11,817.56 439.64,802.03 447.33,802.03 463,802.03 465.5,802.03 465.5,807.03 475.5,807.03 475.5,797.03 485.5,797.03 485.5,807.03 495.5,807.03 495.5,802.03 507.97,802.03 515,795 515,792.5 520,792.5 520,782.5 510,782.5 510,772.5 515,772.5 515,767.72 515,750.87 U2.A2@513.5,749.37
DDR_RES_D\C\A\S\: RN7.6 U2.G8 | length 188.8
  Top Layer w5: U2.G8@702.48,513.15 719.33,530 780,530 800,550 874.15,550 RN7.6@875.5,551.35
DDR_RES_D\C\L\K\E\: RN9.6 U2.H3 | length 410.7
  Top Layer w5: RN9.6@170,420 175,425 430,425 495,490 528.78,490 U2.H3@545,473.78
DDR_RES_D\C\S\0\: RN4.5 U2.H8 | length 223.2
  Top Layer w5: U2.H8@702.48,473.78 732.85,443.41 761.73,443.41 839.14,366 RN4.5@881,366
DDR_RES_D\R\A\S\: RN7.8 U2.H7 | length 217.1
  Top Layer w4: U2.H7@670.98,473.78 686.48,489.28 793.5,489.28 808.28,474.5 RN7.8@875.5,474.5
DDR_RES_D\W\R\: RN7.7 U2.G7 | length 219.2
  Top Layer w4: U2.G7@670.98,513.15 685.98,498.15 728.15,498.15 748.7,518.7 RN7.7@875.5,518.7
DDR_RES_DQM0: RN7.5 U2.F7 | length 222.3
  Top Layer w5: U2.F7@670.98,552.52 688.46,570 791.75,570 817.25,595.5 RN7.5@875.5,595.5
DDR_RES_DQM1: RN9.8 U2.F3 | length 398.1
  Top Layer w5: RN9.8@170,496.85 325.59,496.85 357.39,528.65 521.13,528.65 U2.F3@545,552.52
DDR_RES_DQS0: R3.2 U2.E7 | length 457.4
  Top Layer w4: R3.2@307.52,710 307.52,708.23 315.56,700.19 317.33,700.19 361.54,655.98 361.54,613.5 379.04,596 436.63,596 463.74,568.89 523.03,568.89 529.66,575.52 558,575.52 574.37,591.89 U2.E7@670.98,591.89
DDR_RES_DQS1: R4.2 U2.E3 | length 368.4
  Top Layer w4: 452.64,592.01 467.76,576.89 519.72,576.89 526.35,583.52 532.84,583.52 541.21,591.89 U2.E3@545,591.89
  Top Layer w5: R4.2@307.52,760 330,760 340,750 340,705 370.04,674.96 370.04,636.63 392.35,614.32 430.33,614.32 452.64,592.01
DDR_VREF: C1.1 C2.2 R1.1 R2.2 R12.2 U1.M20 U2.F1 | length 1646.6
  Top Layer w5: U1.M20@808.46,1391.5 v1(824.21,1375.75)
  Top Layer w10: C2.2@305.76,525 337.48,525 v2(365,552.52) ; C1.1@305.76,565 349.81,565 362.29,552.52 v2(365,552.52) ; R2.2@307.52,608.23 R2.2@307.52,610 ; R1.1@307.52,660 R2.2@307.52,610 ; U2.F1@482.01,552.52 v2(365,552.52) ; R2.2@307.52,610 330,610 365,575 v2(365,552.52)
  Bottom Layer w4: R12.2@422.48,550 419.96,552.52 v2(365,552.52) 365,730 432.5,797.5 453.5,797.5 471,815 471,871 520,920 710,920 744.22,954.22 744.22,1149.26 744.22,1243.75 744.22,1347.76 755.21,1358.75 807.22,1358.75 v1(824.21,1375.75)
DR0PRI: U1.J5 U4.94 | length 844.8
  Top Layer w3: v1(288.9,1439.67) 288.9,1439.81 290,1440.92 290,1460 301.94,1471.94 321.98,1471.94 U1.J5@336.02,1485.98
  MidLayer1 w3: v2(190,965) 210.5,944.5 259.75,944.5 320,1004.75 320,1081.24 320,1408.56 v1(288.9,1439.67)
  Bottom Layer w3: v2(190,965) 210.5,944.5 255.38,944.5 267.65,956.77 U4.94@332.44,956.77
F\L\A\S\H\_\A\S\M\0\: U1.A10 U3.B4 | length 654.6
  Top Layer w4: v2(630.43,2206.25) 632.93,2208.75 659.26,2208.75 670.76,2220.25 670.76,2251.13 U3.B4@656.26,2265.63
  Top Layer w5: v1(469,1765) 470,1765 493.5,1741.5 U1.A10@493.5,1737.95
  Bottom Layer w4: v1(469,1765) 480,1776 480,2075 610,2205 629.18,2205 v2(630.43,2206.25)
F\L\A\S\H\_\W\A\I\T\: U1.R20 U3.F7 | length 1540.9
  Top Layer w3: U3.F7@774.37,2108.15 773.89,2108.63 760.89,2108.63 745,2124.52 695.48,2124.52 681.63,2138.37 681.63,2192.69 689.83,2200.89 744.11,2200.89 760.37,2184.63 760.37,2181.09 774.26,2167.2 782.97,2167.2 798.97,2151.2 798.97,2142.49 813.46,2128 v2(830,2128)
  Top Layer w5: U1.R20@808.46,1297.01 v1(824.21,1281.26)
  MidLayer1 w3: v1(820,1795) 823.24,1795 825,1796.76 825,1820 775.5,1869.5 775.41,1869.5 766.33,1878.58 766.33,2064.33 v2(830,2128)
  MidLayer2 w3: v1@815,1795 770.5,1795 751,1775.5 751,1754.9 733.46,1737.36 725.08,1737.36 714.54,1726.82 714.54,1718.78 701.66,1705.89 693.61,1705.89 683.06,1695.34 683.06,1688.06 670.17,1675.17 662.89,1675.17 652.73,1665.01 652.73,1657.73 641,1646 626,1646 620,1640 620,1528.67 632,1516.67 640.1,1516.67 650.87,1505.9 650.87,1497.56 664.19,1484.24 672.53,1484.24 684.23,1472.54 684.23,1464.2 707.43,1441 764,1441 777.52,1427.48 777.52,1308.16 790.03,1295.64 809.83,1295.64 v1(824.21,1281.26)
FLASH_A1: U1.B2 U3.A1 | length 1497.7
  Top Layer w4: v2(255.75,1878.33) 256.01,1878.59 256.01,1906.01 272.13,1922.13 282.13,1922.13 284.13,1922.13 284.13,1929 298.13,1929 298.13,1912.13 312.13,1912.13 312.13,1929 326.13,1929 326.13,1912.13 340.13,1912.13 340.13,1922.13 351.99,1922.13 355.21,1922.13 355.21,1930.21 356.63,1931.63 346.1,1942.16 352.46,1948.52 368.65,1932.34 375.01,1938.7 358.83,1954.89 365.19,1961.25 381.38,1945.06 387.74,1951.43 371.55,1967.61 377.92,1973.98 394.1,1957.79 400.47,1964.16 383.64,1980.99 390,1987.35 406.83,1970.52 413.2,1976.88 407.54,1982.54 413.9,1988.9 416.01,1991.01 427.33,1991.01 439,2002.69 439,2246.63 494.89,2302.51 535.66,2302.51 U3.A1@538.15,2305
  Top Layer w5: v1(225.79,1721.46) 226.16,1721.46 241.16,1706.46 U1.B2@241.54,1706.46
  MidLayer1 w4: v1(225.79,1721.46) 212.03,1707.7 174.93,1707.7 162.92,1719.72 151.75,1719.72 151.75,1728.72 172.92,1728.72 172.92,1737.72 151.75,1737.72 151.75,1746.72 172.92,1746.72 172.92,1755.72 151.75,1755.72 151.75,1764.72 162.92,1764.72 162.92,1785.21 140.34,1785.21 138,1787.55 138,1792.5 140.5,1795 169.66,1795 172,1797.34 172,1802.66 169.66,1805 141,1805 138.66,1807.34 138.66,1810.66 143,1815 167,1815 169.34,1817.34 169.34,1820.66 165,1825 145,1825 140.66,1829.34 140.66,1832.66 143,1835 170,1835 173.34,1838.34 173.34,1841.66 170,1845 160,1845 156.66,1848.34 156.66,1851.66 171.76,1866.76 244.18,1866.76 v2(255.75,1878.33)
FLASH_A2: U1.A2 U3.B1 | length 1455.7
  Top Layer w4: v2(250,1842) 312.25,1842 463,1992.75 463,2234.31 493.65,2264.96 537.48,2264.96 U3.B1@538.15,2265.63
  Top Layer w5: v1(226.25,1754.16) 226.25,1753.7 241.54,1738.41 U1.A2@241.54,1737.95
  MidLayer2 w5: v1(226.25,1754.16) 226.25,1771.25 240,1785 285,1785 287.93,1787.93 287.93,1792.07 285,1795 210,1795 207.07,1797.93 207.07,1802.07 210,1805 290,1805 294.9,1809.9 294.9,1812.45 287.34,1820 205,1820 200,1825 200,1935 207.5,1942.5 207.5,1972.07 210.43,1975 280,1975 285,1970 285,1927.93 282.07,1925 212.93,1925 210,1922.07 210,1865 215,1860 230,1860 248,1842 v2(250,1842)
FLASH_A3: U1.B3 U3.C1 | length 1511.3
  Top Layer w4: v2(390,1860) 392.63,1860 402.63,1850 427.66,1850 430,1852.34 430,1859.89 430,1861.89 406,1861.89 406,1870.89 443.55,1870.89 443.55,1879.89 407.82,1879.89 407.82,1888.89 443.55,1888.89 443.55,1897.89 411.94,1897.89 411.94,1906.89 420.53,1915.47 ; 420.53,1915.48 428.08,1923.03 428.08,1923.89 435.56,1916.41 441.92,1922.78 434.45,1930.25 440.81,1936.62 446.56,1930.87 452.92,1937.23 447.18,1942.98 453.54,1949.34 453.94,1948.94 456,1951 487,1982 487,2212 499.34,2224.34 536.23,2224.34 U3.C1@538.15,2226.26
  Top Layer w5: v1(255.28,1720.28) 257.21,1720.28 271.04,1706.46 U1.B3@273.03,1706.46
  MidLayer1 w3: v1(255.28,1720.28) 253.77,1720.28 ccw(c253.77,1710.76) 244.24,1710.76 cw(c238.49,1710.76) 238.49,1705 225,1705 ccw(c225,1700) 220,1700 220,1695 ccw(c225,1695) 225,1690 235,1690 ccw(c235,1695) 240,1695 cw(c250,1695) 250,1705 259.12,1705 ccw(c259.12,1715.88) 270,1715.88 270,1721.03 cw(c284.77,1721.03) 274.32,1731.47 274.32,1785 cw(c296.84,1785) 277.33,1796.24 cw(c296.84,1785) 280.9,1800.9 287.65,1807.65 295.17,1815.17 ccw(c292.34,1818) 295.17,1820.83 277.32,1838.68 cw(c280.14,1841.51) 277.32,1844.34 cw(c280.14,1841.51) 282.97,1844.34 319.28,1808.03 ccw(c322.11,1810.86) 324.94,1808.03 ccw(c322.11,1810.86) 324.94,1813.68 288.63,1850 cw(c291.46,1852.82) 288.63,1855.65 cw(c291.46,1852.82) 294.29,1855.65 330.6,1819.34 ccw(c333.43,1822.17) 336.25,1819.34 ccw(c333.43,1822.17) 336.25,1825 299.94,1861.31 cw(c302.77,1864.14) 299.94,1866.97 cw(c302.77,1864.14) 305.6,1866.97 341.91,1830.66 ccw(c344.74,1833.48) 347.57,1830.66 ccw(c344.74,1833.48) 347.57,1836.31 311.26,1872.62 cw(c314.09,1875.45) 311.26,1878.28 cw(c314.09,1875.45) 316.91,1878.28 353.23,1841.97 ccw(c356.05,1844.8) 358.88,1841.97 ccw(c356.05,1844.8) 358.88,1847.63 346.08,1860.43 cw(c348.91,1863.25) 346.08,1866.08 347.14,1867.14 cw(c354.04,1860.25) 354.04,1870 372.93,1870 cw(c372.93,1852.93) 385,1865 v2(390,1860)
FLASH_A4: U1.D5 U3.D1 | length 1508.9
  Top Layer w4: v2(520,1910) 520,1914.33 515,1919.33 515,1925 520,1930 527,1930 529.34,1932.34 529.34,1935.66 525,1940 510,1940 505,1945 505,1963.69 511.34,1970.03 511.34,2060.03 511.34,2071.03 cw(c515.84,2071.03) 515.84,2075.53 518.63,2075.53 ccw(c518.63,2080.03) 518.63,2084.53 515.5,2084.53 cw(c515.5,2089.03) 515.5,2093.53 518.63,2093.53 ccw(c518.63,2098.03) 518.63,2102.53 515.5,2102.53 cw(c515.5,2107.03) 515.5,2111.53 518.63,2111.53 ccw(c518.63,2116.03) 518.63,2120.53 515.5,2120.53 cw(c515.5,2125.03) 515.5,2129.53 518.63,2129.53 ccw(c518.63,2134.03) 518.63,2138.53 515.84,2138.53 cw(c515.84,2143.03) 511.34,2143.03 511.34,2152.56 511.34,2160.08 U3.D1@538.15,2186.89
  Top Layer w5: v1(287.28,1629.22) 321.78,1629.22 U1.D5@336.02,1643.46
  MidLayer1 w3: v1(287.28,1629.22) 288.21,1629.22 289.72,1627.72 302.28,1627.72 303.34,1626.66 309,1621 cw(c306.17,1618.17) 309,1615.34 302.06,1608.4 ccw(c304.89,1605.57) 302.06,1602.74 ccw(c304.89,1605.57) 307.71,1602.74 318.19,1613.22 cw(c321.02,1610.39) 323.85,1613.22 cw(c321.02,1610.39) 323.85,1607.56 295.87,1579.58 ccw(c298.7,1576.76) 295.87,1573.93 ccw(c298.7,1576.76) 301.53,1573.93 329.51,1601.91 cw(c332.34,1599.08) 335.16,1601.91 cw(c332.34,1599.08) 335.16,1596.25 301.83,1562.91 ccw(c304.66,1560.09) 301.83,1557.26 ccw(c304.66,1560.09) 307.49,1557.26 337.29,1587.06 cw(c340.11,1584.23) 342.94,1587.06 345,1585 345,1510 365,1510 365,1570 375,1580 481.55,1580 513,1611.45 513,1830 517.54,1834.54 520.22,1837.22 ccw(c517.39,1840.04) 517.39,1844.04 516.95,1844.04 cw(c516.95,1848.04) 516.95,1852.04 537.94,1852.04 ccw(c537.94,1856.04) 537.94,1860.04 515.87,1860.04 cw(c515.87,1864.04) 515.87,1868.04 538.24,1868.04 ccw(c538.24,1872.04) 538.24,1876.04 517,1876.04 cw(c517,1880.04) 517,1884.04 538.24,1884.04 ccw(c538.24,1888.04) 538.24,1892.04 534,1892.04 cw(c534,1896.04) 530,1896.04 530,1899.49 527.49,1902.01 520,1909.49 v2(520,1910)
FLASH_A5: U1.C4 U3.D2 | length 1547
  Top Layer w4: v1(225,1660) 227.46,1662.46 242.46,1662.46 cw(c242.46,1657.46) 247.46,1657.46 ccw(c252.46,1657.46) 257.46,1657.46 cw(c262.46,1657.46) 262.46,1662.46 292.03,1662.46 U1.C4@304.53,1674.96 ; v2@495,1884.08 495,1866.38 495,1850 485,1840 485,1832.5 485,1825 487.22,1822.78 479.64,1815.19 486,1808.83 493.59,1816.41 495,1815 505,1815 525,1835 525,1844.46 530,1844.46 530,1853.46 507.22,1853.46 507.22,1862.46 525,1862.46 525,1873.46 525,1880 495,1910 493,1912 481.69,1912 481.69,1921 495,1921 495,1930 481.69,1930 481.69,1939 490,1939 490,1960 503,1973 503,2188 516.39,2201.39 563.02,2201.39 U3.D2@577.52,2186.89
  MidLayer1 w3: 305,1653.5 305,1663.24 306.76,1665 313.24,1665 315,1663.24 315,1646.76 316.76,1645 323.24,1645 325,1646.76 325,1663.24 326.76,1665 334.74,1665 336.5,1663.24 336.5,1640.97 338.26,1639.21 350.79,1639.21 355,1643.43 355,1650 358.61,1653.61 361.1,1653.61 362.86,1651.86 362.86,1651.34 364.61,1649.58 364.61,1639.6 365,1639.21 422.47,1639.21 455.97,1639.21 ccw(c455.97,1643.21) 459.97,1643.21 459.97,1645.2 cw(c463.97,1645.2) 467.97,1645.2 467.97,1643.21 ccw(c471.97,1643.21) 471.97,1639.21 479.21,1639.21 505,1665 505,1666.5 ccw(c501,1666.5) 501,1670.5 490.27,1670.5 cw(c490.27,1674.5) 490.27,1678.5 503,1678.5 ccw(c503,1682.5) 503,1686.5 495.76,1686.5 cw(c495.76,1690.5) 495.76,1694.5 501,1694.5 ccw(c501,1698.5) 505,1698.5 505,1728.16 505,1820 501.93,1823.07 495,1830 495,1830.57 cw(c499,1830.57) 499,1834.57 502,1834.57 ccw(c502,1838.57) 502,1842.57 493,1842.57 cw(c493,1846.57) 493,1850.57 502,1850.57 ccw(c502,1854.57) 502,1858.57 499,1858.57 cw(c499,1862.57) 495,1862.57 495,1870 495,1883.08 v2(497.5,1885.58)
  MidLayer1 w4: v1(225,1660) 242.66,1660 245,1657.66 245,1653.5 247.34,1651.15 250,1651.15 255,1656.15 255,1670 259.34,1674.34 262.66,1674.34 265,1672 265,1653.5 267.34,1651.15 302.65,1651.15 305,1653.5
FLASH_A6: U1.C7 U3.A2 | length 1541.1
  Top Layer w4: v2(416.18,2008) 430,2021.82 430,2035 430,2037 428,2037 428,2046 431,2046 431,2055 428,2055 428,2064 430,2064 430,2069.38 430,2248.94 500.56,2319.5 563.02,2319.5 U3.A2@577.52,2305
  Top Layer w5: v1(383.27,1690.71) U1.C7@399.02,1674.96
  MidLayer1 w3: v1(383.27,1690.71) 368.86,1676.3 368.86,1653.83 377.47,1645.21 392.47,1645.21 ccw(c392.47,1650.21) 397.47,1650.21 cw(c402.47,1650.21) 407.47,1650.21 ccw(c412.47,1650.21) 412.47,1645.21 422.47,1645.21 432.26,1655 432.26,1673.63 436,1677.37 436,1696 443.63,1703.63 458.63,1703.63 463.76,1708.76 463.76,1730.47 489,1755.72 489,1809.1 475,1823.1 475,1905 455,1925 455,1945 455,1952.75 460,1952.75 460,1960.75 450,1960.75 450,1968.75 460,1968.75 460,1976.75 450,1976.75 450,1984.75 460,1984.75 460,1992.75 450,1992.75 450,2000.75 460,2000.75 460,2008.75 450,2008.75 450,2016.75 460,2016.75 460,2024.75 450,2024.75 450,2032.75 460,2032.75 460,2040.75 450,2040.75 450,2048.75 460,2048.75 460,2056.75 450,2056.75 450,2064.75 460,2064.75 460,2072.75 450,2072.75 450,2080.75 460,2080.75 460,2088.75 450,2088.75 450,2096.75 460,2096.75 460,2104.75 455,2104.75 455,2106.25 455,2125 450,2130 425,2130 416.18,2121.18 416.18,2105.53 416.18,2103.5 411.18,2103.5 411.18,2095.5 421.18,2095.5 421.18,2087.5 411.18,2087.5 411.18,2079.5 421.18,2079.5 421.18,2071.5 411.18,2071.5 411.18,2063.5 421.18,2063.5 421.18,2055.5 411.18,2055.5 411.18,2047.5 421.18,2047.5 421.18,2039.5 411.18,2039.5 411.18,2031.5 416.18,2031.5 416.18,2030 v2(416.18,2008)